# Altium PCB Terminal_IoT_rev2.PcbDoc
Units mm, origin at the board's own origin, x right, y up, seen from the top; angles counter-clockwise.
Board outline 100 x 80 mm, 2 copper layers (Top Layer, Bottom Layer); 47 components, 30 nets, 157 pads, 213 vias.
Unrouted connection lines stored in the file: 28.
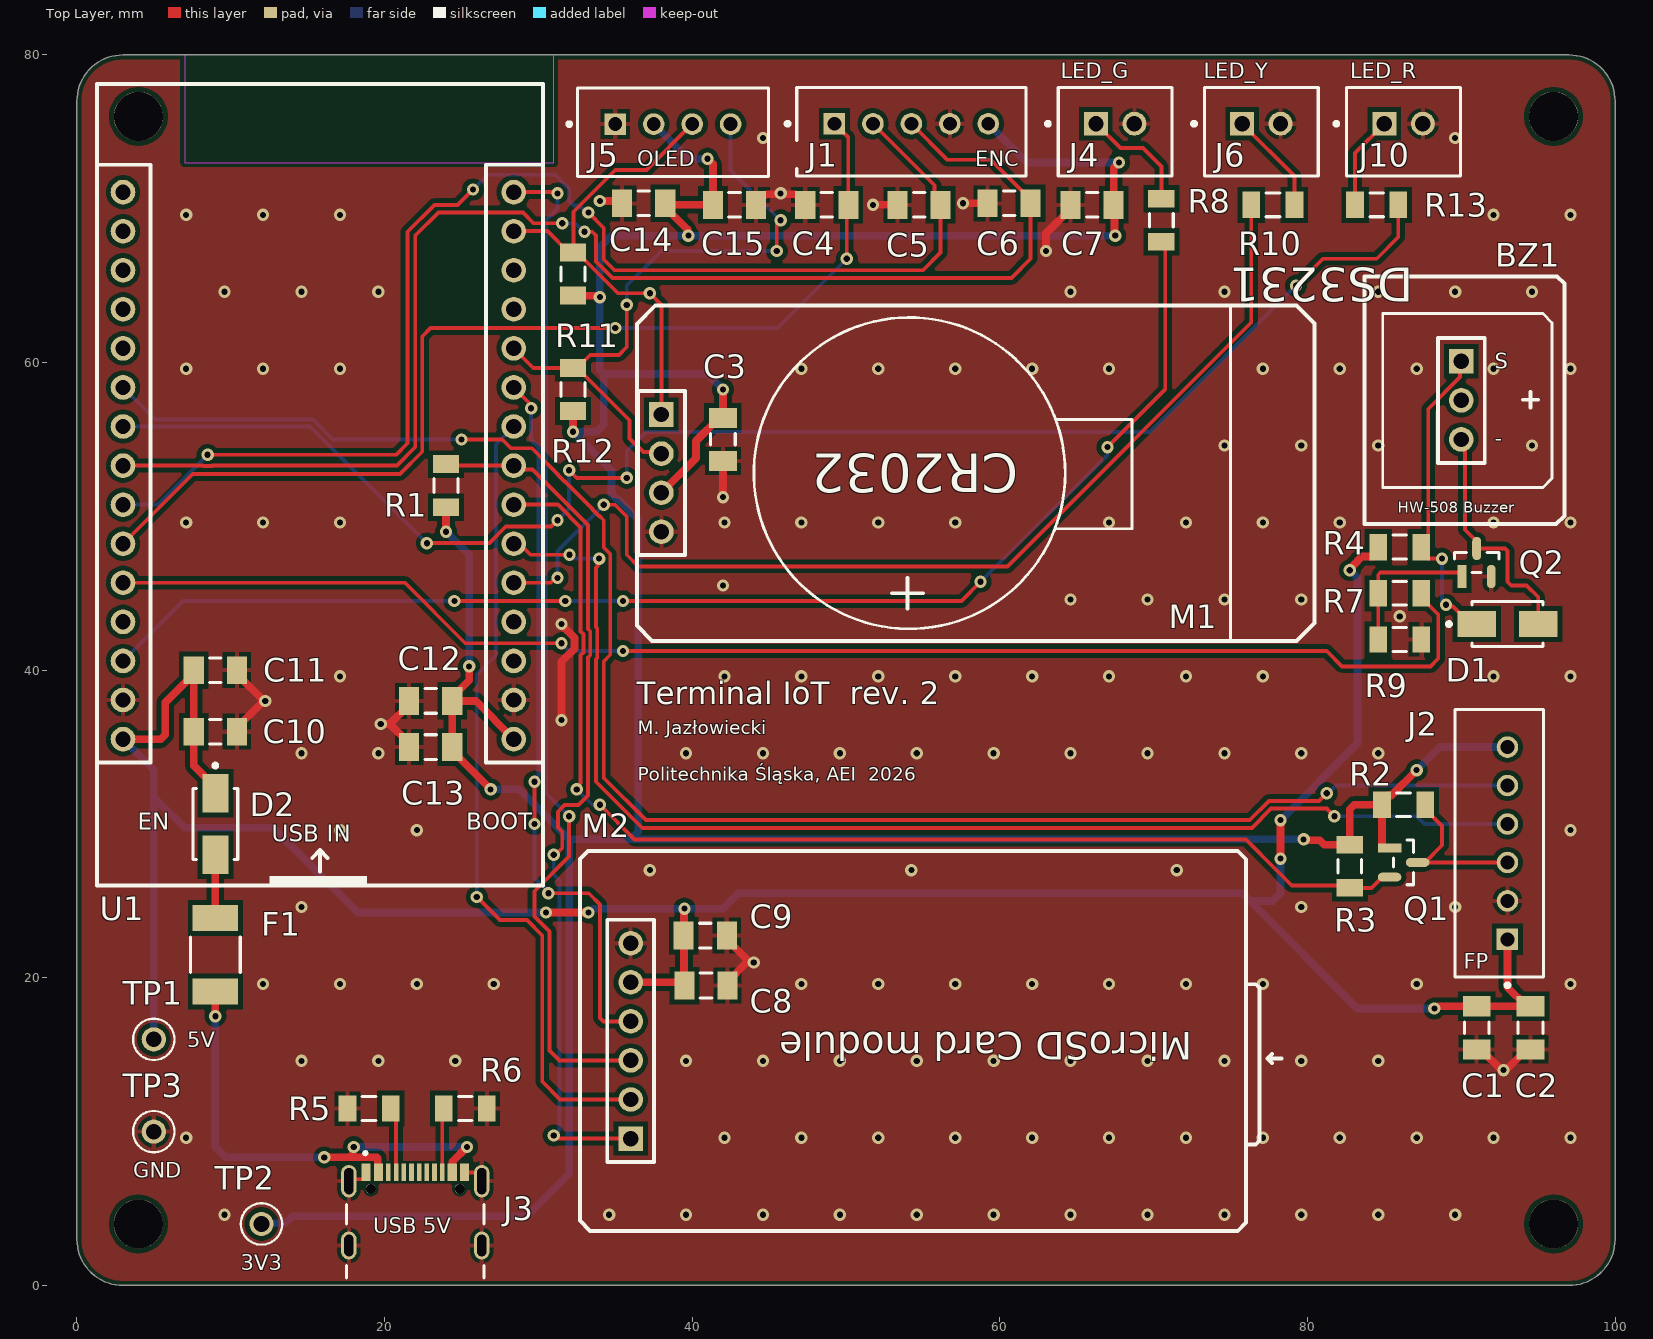
[diagram p0: Top Layer view]
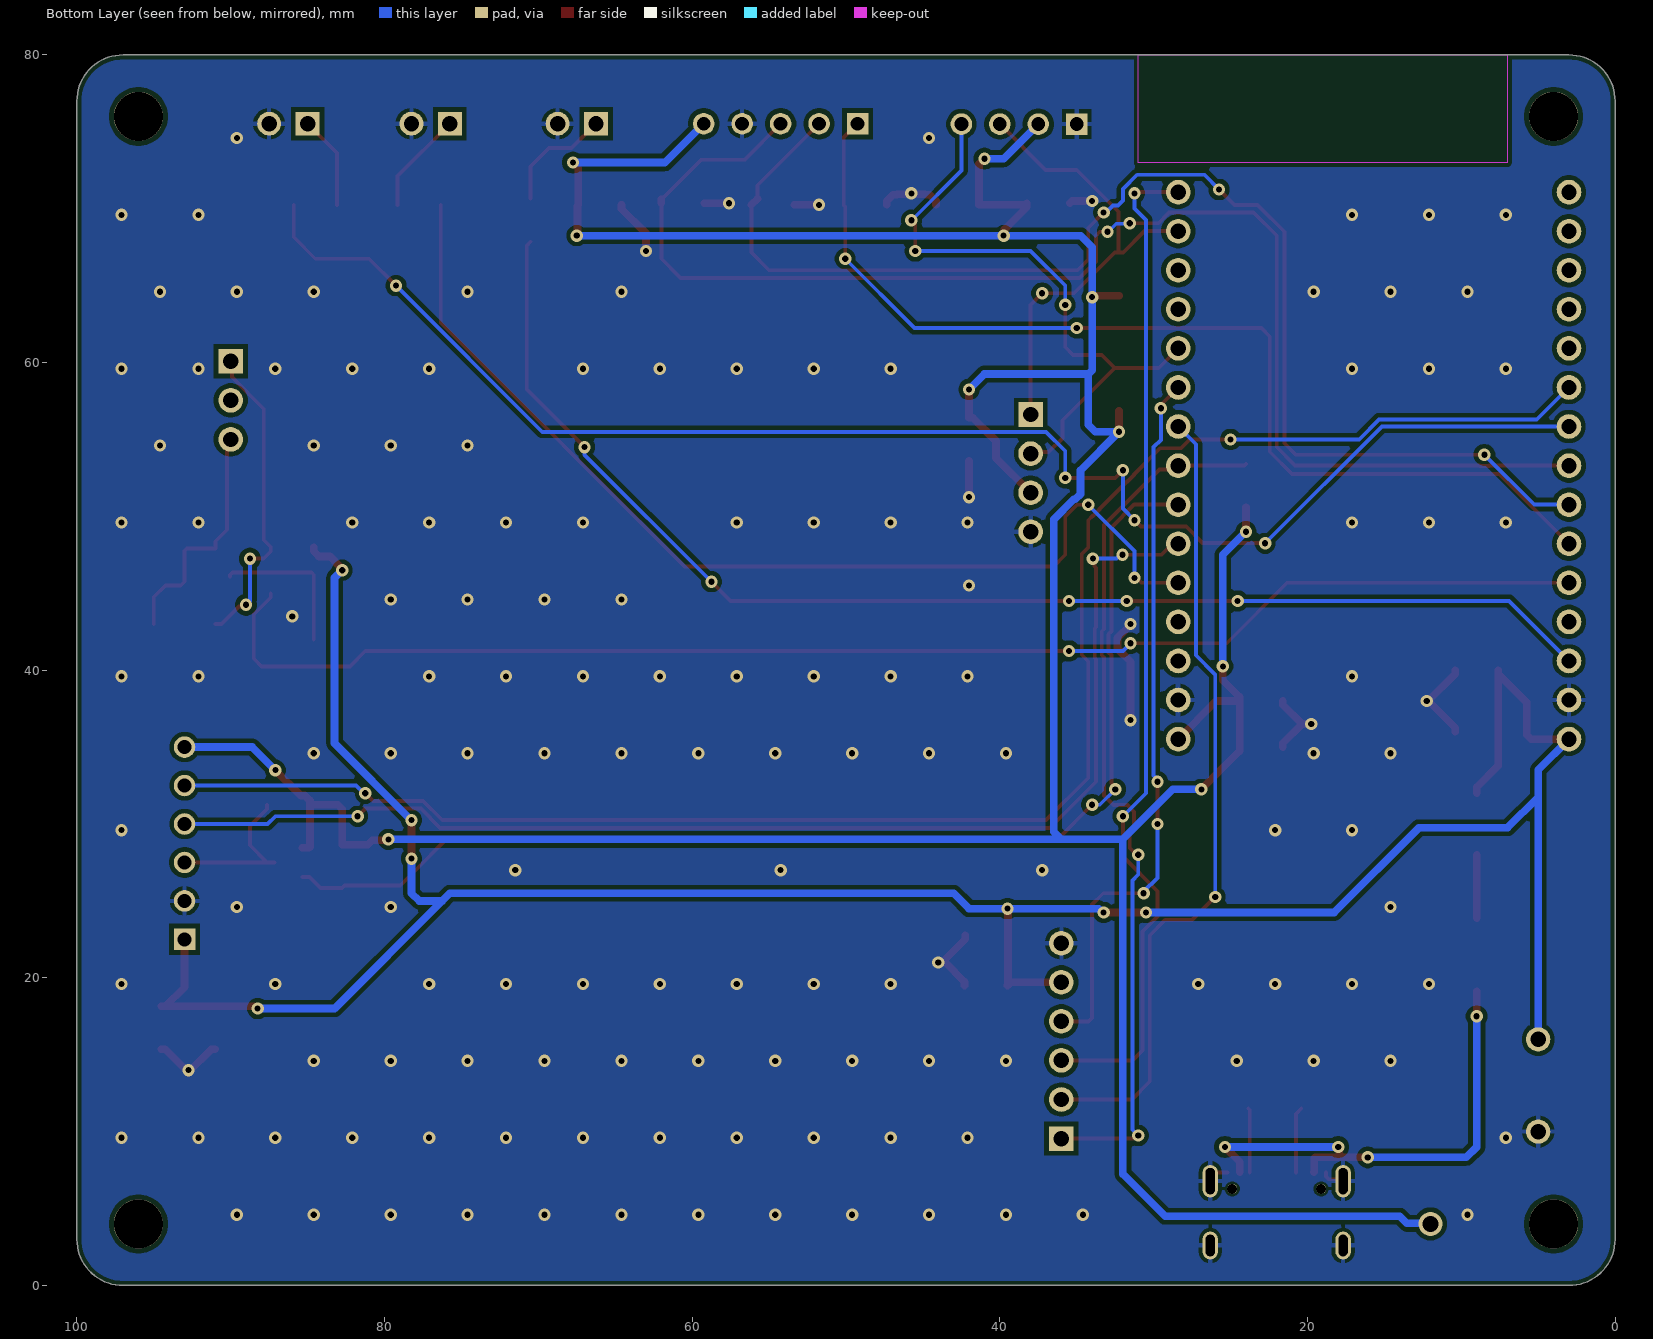
[diagram p1: Bottom Layer view, seen from below]
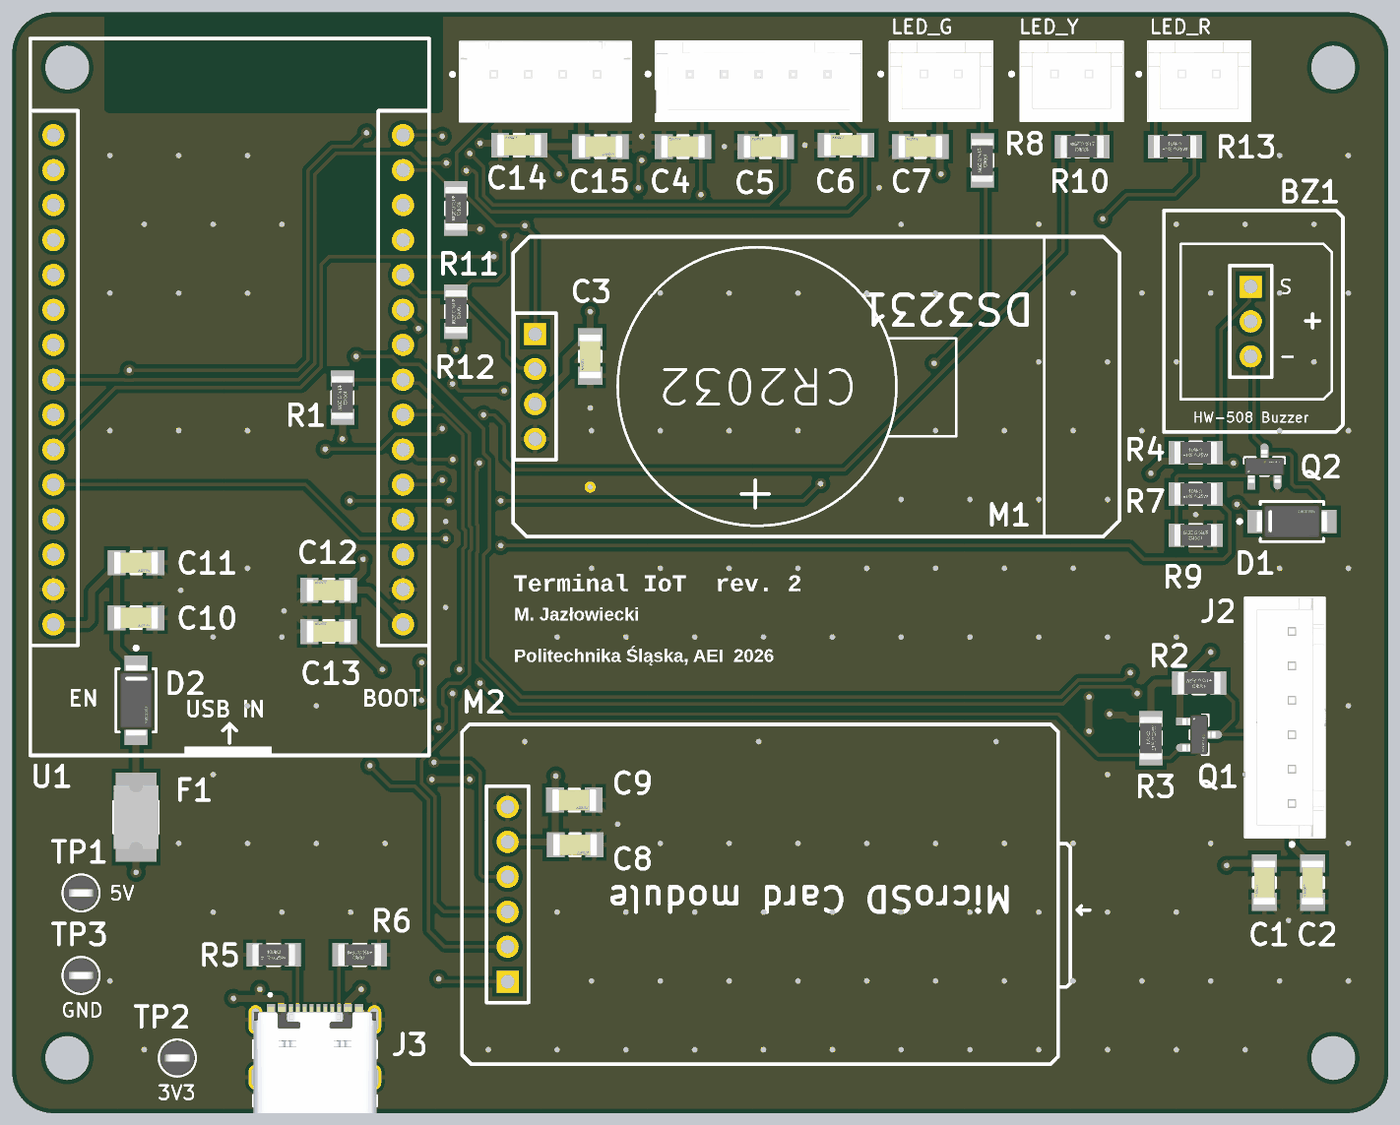
[diagram p2: 3D render of the assembled board from above, using the file's embedded part models]

## Layer stack, top to bottom
Top Solder: solder mask 0.0102, Solder Resist, Dk 3.5
Top Layer: signal copper 0.0356
Dielectric 1: dielectric 0.32, FR-4, Dk 4.8
Bottom Layer: signal copper 0.0356
Bottom Solder: solder mask 0.0102, Solder Resist, Dk 3.5

## Board outline
0,3 0,77 cw(c3,77) 3,80 97,80 cw(c97,77) 100,77 100,3 cw(c97,3) 97,0 3,0 cw(c3,3)

## Design rules (kind name [scope] priority, off if disabled: settings)
BoardOutlineClearance [All] p1: gap=0.3 ignorepadtopadclearanceinfootprint=FALSE
Clearance Clearance_J3 [InComponent('J3')] p1: gap=0.15 ignorepadtopadclearanceinfootprint=FALSE
Clearance Clearance_1 [InPolygon] p2: gap=0.3 ignorepadtopadclearanceinfootprint=FALSE
Clearance [All] p3: gap=0.2 ignorepadtopadclearanceinfootprint=FALSE
HoleSize [All] p1: absolutevalues=TRUE maxlimit=6.3 minlimit=0.3 maxpercent=80.000 minpercent=20.000
HoleToHoleClearance [All] p1: gap=0.5 allowstackedmicrovias=TRUE
MinimumAnnularRing [All] p1: minimumring=0.15
MinimumSolderMaskSliver MinimumSolderMaskSliver_USB_C [InComponent('J3')] p1: minsoldermaskwidth=0.09
MinimumSolderMaskSliver [All] p2: minsoldermaskwidth=0.254
PolygonConnect Via_Direct [IsVia] p1: connectstyle=Direct reliefconductorwidth=0.254 reliefentries=4 polygonreliefangle="90 Angle" airgapwidth=0.254
PolygonConnect [All] p2: connectstyle=Relief reliefconductorwidth=0.3 reliefentries=4 polygonreliefangle="90 Angle" airgapwidth=0.25
RoutingVias [All] p1: holewidth=0.6 width=0.8 viastyle="Through Hole" minholewidth=0.3 minwidth=0.6 maxholewidth=0.4 maxwidth=1
SolderMaskExpansion [All] p1: expansion=0 istentingtop=FALSE
SupplyNets "Schematic Supply Nets" [InNet('GND')] p1: voltage=0.000
Width Width_Power [InNetClass('Power')] p1: maxlimit=1.5 minlimit=0.3 preferedwidth=0.5
Width [All] p2: maxlimit=1 minlimit=0.2 preferedwidth=0.25
27 further rules are at their usual default settings.

## Classes and differential pairs
net class Power: V3V3 V5V0 VBUS

## Components (designator, comment, footprint, x,y, rotation, side; value= is the part's Value field where it differs from the comment)
BZ1 "Buzzer" BUZZER_HW508 90,60.08 r0 top
C1 "100nF" Capacitor_FP-C1206C-EB-IPC_B 91,16.75 r90 top
C2 "10μF" Capacitor_FP-C1206C-EB-IPC_B 94.5,16.75 r90 top
C3 "100nF" Capacitor_FP-C1206C-EB-IPC_B 42,55 r90 top
C4 "10nF" Capacitor_FP-C1206C-EB-IPC_B 48.75,70.25 r0 top
C5 "10nF" Capacitor_FP-C1206C-EB-IPC_B 54.75,70.25 r0 top
C6 "10nF" Capacitor_FP-C1206C-EB-IPC_B 60.6,70.35 r0 top
C7 "100nF" Capacitor_FP-C1206C-EB-IPC_B 66,70.25 r0 top
C8 "10μF" Capacitor_FP-C1206C-EB-IPC_B 40.9,19.5 r180 top
C9 "100nF" Capacitor_FP-C1206C-EB-IPC_B 40.849,22.75 r180 top
C10 "100nF" Capacitor_FP-C1206C-EB-IPC_B 9,36 r180 top
C11 "10μF" Capacitor_FP-C1206C-EB-IPC_B 9,40 r180 top
C12 "100nF" Capacitor_FP-C1206C-EB-IPC_B 23,38 r0 top
C13 "10μF" Capacitor_FP-C1206C-EB-IPC_B 23,35 r0 top
C14 "100nF" Capacitor_FP-C1206C-EB-IPC_B 36.85,70.35 r0 top
C15 "10μF" Capacitor_FP-C1206C-EB-IPC_B 42.75,70.25 r180 top
D1 "B340A" FP-SMA-MFG 93,43 r0 top
D2 "B340A" FP-SMA-MFG 9,30 r270 top
F1 "PTC 1,1A 1812" BOUR-MF-MSMF110-24X-2_V 9,21.5 r90 top
J1 "Waveshare 9533" FP-B5B-XH-A_LF_SN-MFG 54.25,75 r180 top
J2 "R307 Fingerprint sensor" FP-B6B-XH-A_LF_SN-MFG 92.475,28.75 r90 top
J3 "USB4105-GF-A" GCT_USB4105-GF-A 22,2.6 r0 top
J4 "GREEN" FP-B2B-XH-A_LF_SN-MFG 67.5,75 r0 top
J5 "OLED" FP-B4B-XH-A_LF_SN-MFG 38.75,74.975 r180 top
J6 "YELLOW" FP-B2B-XH-A_LF_SN-MFG 77,75 r0 top
J10 "RED" FP-B2B-XH-A_LF_SN-MFG 86.25,75 r0 top
M1 "DS3231 module" DS3231_MODUL 38,49 r180 top
M2 "MicroSD reader module" MICROSD_MODUL 36,9.55 r180 top
Q1 "BSS138" BSS138 86.25,27.5 r0 top
Q2 "BSS138" BSS138 91,47 r90 top
R1 "10K" "RESISTOR 1206" 24,52 r270 top
R2 "10K" "RESISTOR 1206" 86.25,31.25 r180 top
R3 "10K" "RESISTOR 1206" 82.75,27.25 r90 top
R4 "68" "RESISTOR 1206" 86,48 r0 top
R5 "5K1" "RESISTOR 1206" 19,11.5 r0 top
R6 "5K1" "RESISTOR 1206" 25.25,11.5 r180 top
R7 "100" "RESISTOR 1206" 86,45 r0 top
R8 "330" "RESISTOR 1206" 70.5,69.25 r270 top
R9 "4K7" "RESISTOR 1206" 86,42 r180 top
R10 "330" "RESISTOR 1206" 77.75,70.25 r180 top
R11 "4K7" "RESISTOR 1206" 32.25,65.75 r270 top
R12 "4K7" "RESISTOR 1206" 32.25,58.25 r270 top
R13 "330" "RESISTOR 1206" 84.5,70.25 r0 top
TP1 "5001" FP-5001-MFG 5,16 r0 top
TP2 "5001" FP-5001-MFG 12,4 r0 top
TP3 "5001" FP-5001-MFG 5,10 r0 top
U1 "ESP32-DevKitC" ESP32_DEVKITC_WROOM-32_15X2PIN 15.7,53.3 r0 top

## Footprints (in the part's own frame and the unit in brackets; to place one, negate y for a bottom-side part, rotate by r counter-clockwise, add the part's x,y. Pads: shape width x height; smd on the part's side, far side on the other; paste and mask are expansions set on the pad)
BOUR-MF-MSMF110-24X-2_V [mm] "Chip Fuse, 2-Leads, Body 4.6x3.24mm"
  rect 1.68x2.95 smd: 1(-2.39,0) 2(2.39,0)
  silkscreen extent -1.15,-1.62 1.15,1.62, body extent -2.3,-1.62 2.3,1.62, height 1.15
BSS138 [mm]
  rect 1.524x0.578 smd paste+0 mask+0: 1(-0.91,0.95)
  rrect100% 1.524x0.578 smd paste+0 mask+0: 2(-0.91,-0.95) 3(0.91,0)
  silkscreen extent -0.65,-1.45 0.65,1.45, body extent -1.92,-1.7 1.92,1.7, height 0.25
BUZZER_HW508 [mm]
  rect 1.6x1.6 hole 1: 1(0,0)
  round 1.6 hole 1: 2(0,-2.54) 3(0,-5.08)
  silkscreen extent -6.3,-10.58 6.7,5.52, body extent -6.3,-10.7 6.8,5.6, height 19
Capacitor_FP-C1206C-EB-IPC_B [mm]
  rect 1.305x1.806 smd paste+0 mask+0: 1(-1.401,0) 2(1.401,0)
  silkscreen extent -0.37,-0.8 0.37,0.8, body extent -2.3,-1.15 2.3,1.15, height 0.25
DS3231_MODUL [mm]
  rect 1.6x1.6 hole 1: 1(0,-7.62)
  round 1.6 hole 1: 2(0,-5.08) 3(0,-2.54) 4(0,0)
  silkscreen extent -42.47,-14.7 1.6,7.1, body extent -42.7,-14.9 1.78,7.15, height 19.5
ESP32_DEVKITC_WROOM-32_15X2PIN [mm]
  round 1.6 hole 1: 1(-12.7,17.78) 2(-12.7,15.24) 3(-12.7,12.7) 4(-12.7,10.16) 5(-12.7,7.62) 6(-12.7,5.08) 7(-12.7,2.54) 8(-12.7,0) 9(-12.7,-2.54) 10(-12.7,-5.08) 11(-12.7,-7.62) 12(-12.7,-10.16) 13(-12.7,-12.7) 14(-12.7,-15.24) 15(-12.7,-17.78) 16(12.7,-17.78) 17(12.7,-15.24) 18(12.7,-12.7) 19(12.7,-10.16) 20(12.7,-7.62) 21(12.7,-5.08) 22(12.7,-2.54) 23(12.7,0) 24(12.7,2.54) 25(12.7,5.08) 26(12.7,7.62) 27(12.7,10.16) 28(12.7,12.7) 29(12.7,15.24) 30(12.7,17.78)
  silkscreen extent -14.4,-27.31 14.6,24.8, body extent -14.4,-27.31 14.6,24.8, height 15
FP-5001-MFG [mm]
  round 1.57 hole 1.016 paste-2539.97 mask+0: 1(0,0)
  silkscreen extent -1.35,-1.34 1.35,1.34, body extent -1.45,-1.45 1.45,1.45, height 0.25
FP-B2B-XH-A_LF_SN-MFG [mm]
  rect 1.55x1.55 hole 1 paste-2539.97 mask+0: 1(-1.25,0.525)
  round 1.55 hole 1 paste-2539.97 mask+0: 2(1.25,0.525)
  silkscreen extent -4.5,-2.88 3.7,2.88, body extent -3.8,-2.98 3.8,2.98, height 0.25
FP-B4B-XH-A_LF_SN-MFG [mm]
  rect 1.4x1.4 hole 0.9 paste-2539.97 mask+0: 1(3.75,-0.525)
  round 1.4 hole 0.9 paste-2539.97 mask+0: 2(1.25,-0.525) 3(-1.25,-0.525) 4(-3.75,-0.525)
  silkscreen extent -6.2,-2.88 6.87,2.88, body extent -6.3,-2.98 6.3,2.98, height 0.25
FP-B5B-XH-A_LF_SN-MFG [mm]
  rect 1.4x1.4 hole 0.9 paste-2539.97 mask+0: 1(5,-0.525)
  round 1.4 hole 0.9 paste-2539.97 mask+0: 2(2.5,-0.525) 3(0,-0.525) 4(-2.5,-0.525) 5(-5,-0.525)
  silkscreen extent -7.45,-2.88 8.17,2.88, body extent -7.55,-2.98 7.55,2.98, height 0.25
FP-B6B-XH-A_LF_SN-MFG [mm]
  rect 1.4x1.4 hole 0.9 paste-2539.97 mask+0: 1(-6.25,-0.525)
  round 1.4 hole 0.9 paste-2539.97 mask+0: 2(-3.75,-0.525) 3(-1.25,-0.525) 4(1.25,-0.525) 5(3.75,-0.525) 6(6.25,-0.525)
  silkscreen extent -9.35,-2.88 8.7,2.88, body extent -8.8,-2.98 8.8,2.98, height 0.25
FP-SMA-MFG [mm]
  rect 2.5x1.7 smd paste+0 mask+0: 1(-2,0) 2(2,0)
  silkscreen extent -3.92,-1.46 2.3,1.46, body extent -3.35,-1.56 3.35,1.56, height 0.25
GCT_USB4105-GF-A [mm]
  rect 0.6x1.15 smd mask+0.05: A1_B12(-3.2,4.755) A4_B9(-2.4,4.755) B1_A12(3.2,4.755) B4_A9(2.4,4.755)
  rect 0.3x1.15 smd mask+0.05: A5(-1.25,4.755) A6(-0.25,4.755) A7(0.25,4.755) A8(1.25,4.755) B5(1.75,4.755) B6(0.75,4.755) B7(-0.75,4.755) B8(-1.75,4.755)
  oval 1x2.1 hole 0.6 slot 1.7 at 90 deg: SH1(-4.32,4.18) SH2(4.32,4.18)
  oval 1x1.8 hole 0.6 slot 1.4 at 90 deg: SH3(-4.32,0) SH4(4.32,0)
  round 0.65 hole 0.65 unplated: ""(-2.89,3.68) ""(2.89,3.68)
  silkscreen extent -4.47,-2.1 4.47,6.1, body extent -4.47,-2.6 4.47,5.11, height 3.32
MICROSD_MODUL [mm]
  rect 1.6x1.6 hole 1: 1(0,0)
  round 1.6 hole 1: 2(0,-2.54) 3(0,-5.08) 4(0,-7.62) 5(0,-10.16) 6(0,-12.7)
  silkscreen extent -42.3,-18.7 3.3,6, body extent -40.1,-18.8 3.4,6.1, height 14
"RESISTOR 1206" [mm]
  rect 1.156x1.71 smd paste+0 mask+0: 1(-1.401,0) 2(1.401,0)
  silkscreen extent -0.45,-0.77 0.45,0.77, body extent -2.23,-1.1 2.23,1.1, height 0.25

## Part data
BZ1: "positive, negative terminals + input signal"
C1 C2 C3 C4 C5 C6 C7 C8 C9 C10 C11 C12 C13 C14 C15: library part Cap, "Capacitor", LatestRevisionDate=17-Jul-2002, LatestRevisionNote="Re-released for DXP Platform.", PackageDescription="Radial Cap, Thru-Hole; 2 Leads; 0.3 in Pin Spacing", PackageReference=RAD-0.3, Published=8-Jun-2000, Publisher="Altium Limited"
D1 D2: library part CMP-1667-00003-3, "DIODE SCHOTTKY 40V 3A SMA", Average Rectified Current=3A, Capacitance=250pF, Case/Package=SMA, Forward Voltage=500mV, Max Forward Surge Current (Ifsm)=80A, Max Operating Temperature=125°C, Max Repetitive Reverse Voltage (Vrrm)=40V, Max Reverse Current=500uA, Min Operating Temperature=-55°C, Package Quantity=5000, Contact Plating=Tin, Current=3A, Current Rating=3A, Element Configuration=Single, Forward Current=3A, Height=2.3mm, Lead Free="Lead Free", Length=4.6mm, Max Reverse Voltage (DC)=40V, Mount="Surface Mount", Number of Pins=2, Output Current=3A, Packaging="Tape and Reel", Peak Non-Repetitive Surge Current=80A, Polarity=Standard, Radiation Hardening=No, REACH SVHC="No SVHC", RoHS Compliant=Yes, Series=-, Termination=SMD/SMT, Voltage=40V, Voltage Rating (DC)=40V, Weight=0.002258oz, Width=2.92mm
F1: library part CMP-2100-03655-1, "PTC Resettable Fuse, 24 V, 1.1 A, -40 to 85 degC, 2-Pin SMD, RoHS, Tape and Reel", Case Code (Imperial)=1812, Case Code (Metric)=4532, Manufacturer=Bourns, Max Current Rating=20A, Max Operating Temperature=85degC, Min Operating Temperature=-40degC, Package Description="2-Pin Surface Mount Device, Body 4.6 x 3.24 mm", Package Reference=MF-MSMF110-24X-2, Power Dissipation=800mW, Supply Voltage=24V, Case/Package=1812, Contact Plating=Gold, Datasheet URL=http://www.bourns.com/docs/Product-Datasheets/mfmsmf.pdf, Datasheet Version="Rev. AG, 08/2016", Height=1.6mm, Length=4.83mm, Manufacturer URL=http://www.bourns.com/, Mount=SurfaceMount, Number of Terminals=2, Packaging=TapeandReel, Radiation Hardening=No, REACH SVHC=NoSVHC, RoHSCompliant=true, Voltage Rating=24V, Voltage Rating (DC)=24V, Width=3.41mm
J1: "compact rotary encoder module featuring a built-in button, designed to detect clockwise and anti-clockwise rotation for menu navigation, volume control, or motor positioning"
J2: library part "GROW R307S", "optical fingerprint sensor module from Hangzhou Grow Technology Co., Ltd. It features a high-speed DSP processor, flash memory for storage"
J3: Package=None, Availability=Unavailable, MF="{'manufacturer': u'GCT'}", MP=USB4105-GF-A, Price=None
J4 J6 J10: library part LED2, "Typical RED, GREEN, YELLOW, AMBER GaAs LED", LatestRevisionDate=17-Jul-2002, LatestRevisionNote="Re-released for DXP Platform.", PackageDescription="SM LED; 2 Flat Leads", PackageReference=3.2X1.6X1.1, PackageVersion=Feb-2002, Published=8-Jun-2000, Publisher="Altium Limited"
J5: library part CMP-17439-000250-1, "CONN HEADER VERT 4POS 2.5MM", Color=Natural, Contact Resistance=20mR, Current Rating=3A, Flammability Rating="UL94 V-0", Housing Color=White, Insulation Resistance=1GR, Max Operating Temperature=85°C, Max Voltage Rating (AC)=250V, Min Operating Temperature=-25°C, Package Quantity=500, Connector Type=Header, Contact Finish - Mating=TIN, Contact Material=Brass, Contact Plating=Tin, Contact Shape=Square, Contact Type="Male Pin", Depth=5.75mm, Fastening Type=Detent, Gender=Male, Housing Material=Polyamide, Insulation Color=Natural, Insulation Material=Nylon, Lead Free="Lead Free", Lead Pitch=2.5mm, Length=12.4mm, Mated Stacking Heights=9.8mm, Material=Polyamide, Max Current Rating=3A, Max Voltage Rating (DC)=250V, Mount="Through Hole", Number of Contacts=4, Number of Positions=4, Number of Rows=1, Orientation=Straight, Packaging=Bulk, Pitch=2.5mm, REACH SVHC="No SVHC", Series=XH, Termination=Solder, Voltage Rating=250V, Voltage Rating (AC)=250V, Wire/Cable Gauge=22AWG
M2: library part "microSD Card module", "SPI INTERFACE, 2.54mm, 3.3V - 5.0V"
Q1 Q2: library part MOSFET-N, "N-Channel MOSFET", LatestRevisionDate=17-Jul-2002, LatestRevisionNote="Re-released for DXP Platform.", PackageDescription="TO, Flat Index; 3 In-Line, Axial Leads; Body Dia. 4.6mm; Lead Dia. 0.5 mm (max)", PackageReference=E3, PackageVersion=1995/1996, Published=8-Jun-2000, Publisher="Altium Limited"
R1 R2 R3 R4 R5 R6 R7 R8 R9 R10 R11 R12 R13: library part Res2, "Resistor", LatestRevisionDate=17-Jul-2002, LatestRevisionNote="Re-released for DXP Platform.", PackageDescription="Axial Device, Thru-Hole; 2 Leads; 0.4 in Pin Spacing", PackageReference=AXIAL-0.4, Published=8-Jun-2000, Publisher="Altium Limited"
TP1 TP2 TP3: library part CMP-2000-05181-2, "PC TEST POINT MINIATURE BLACK", Color=Black, Flammability Rating="UL94 V-0", Package Quantity=100, Body Material=Bronze, Contact Material=Bronze, Contact Plating=Silver, Diameter=2.54mm, Height=0.3inch, Hole Diameter=1.6mm, Housing Color=Black, Inside Diameter=1.27mm, Insulation=Insulated, Insulation Material=Nylon, Lead Free="Lead Free", Length=7.62mm, Material=Nylon, Mount="Through Hole", Number of Contacts=1, Number of Ports=1, Orientation=Straight, Outside Diameter=2.54mm, Packaging=Bulk, Plating=Silver, REACH SVHC="No SVHC", RoHS Compliant=Yes, Series=THM, Termination="Through Hole"
U1: "Płytka rozwojowa z układem ESP32, 30 wyprowadzeń, mostek CP2102, stabilizator AMS1117-3.3"

## Free pads (board coordinates)
  round 3.2 hole 3.2 unplated: H1(4,4) H2(96,4) H3(4,76) H4(96,76)

## Via types
v1: diameter 0.8, hole 0.4, Top Layer to Bottom Layer, tented both sides, 212 vias
v2: diameter 0.8, hole 0.4, Top Layer to Bottom Layer, 1 vias

## Nets (pads, with @x,y where several pads share a name; then routed paths per layer and width w, separated by ;. In a path a pad name is that pad's centre, name@x,y a point inside that pad or via, vN(x,y) a via of type N, cw(c..) or ccw(c..) an arc to the next point about the centre after c; other vN are vias at no path point)
BUZZER_SIG: R7.2 U1.11 | length 92.7
  Top Layer w0.25: U1.11 21.32,45.68 25.25,41.75 v1(31.5,41.75) ; v1(35.5,41.25) 81.25,41.25 82.25,40.25 88,40.25 88.5,40.75 88.5,43.624 87.401,44.723 R7.2
  Bottom Layer w0.25: v1(31.5,41.75) 32,41.25 v1(35.5,41.25)
ENC_SIA: C4.2 J1.1 U1.10 | length 68.3
  Top Layer w0.25: U1.10 7.53,52.75 21,52.75 22.45,54.2 22.45,61.7 23,62.25 v1(35,62.25) ; J1.1 50.151,74.624 C4.2 50.052,70.151 v1(50.052,66.75)
  Bottom Layer w0.25: v1(35,62.25) 45.552,62.25 v1(50.052,66.75)
ENC_SIB: C5.2 J1.2 U1.9 | length 85
  Top Layer w0.25: v1(8.5,54) 20.75,54 21.5,54.75 21.5,68.5 23.25,70.25 24.75,70.25 v1(25.75,71.25) ; v1(33.25,69.75) 34.25,68.75 34.25,66.701 34.951,66 55,66 56.151,67.151 C5.2 ; J1.2 55.748,71.527 C5.2@55.748,70.652
  Top Layer w0.5: C5.2@55.748,70.652 C5.2
  Bottom Layer w0.25: U1.9 5.26,50.76 v1(8.5,54) ; v1(25.75,71.25) 26.705,72.205 31.07,72.205 32,71.275 32,70.533 32.325,70.209 32.642,70.209 33.101,69.75 v1(33.25,69.75)
ENC_SW: C6.2 J1.3 U1.8 | length 90.8
  Top Layer w0.25: U1.8 8.175,53.3 8.2,53.275 8.8,53.275 8.825,53.3 20.8,53.3 22,54.5 22,68.25 23.5,69.75 29.003,69.75 29.695,69.058 v1(31.55,69.058) ; v1(33,68.5) 33.5,68.5 33.75,68.25 33.75,66.564 34.814,65.5 60.75,65.5 62.001,66.751 C6.2 ; J1.3 56.597,73.178 59.424,73.178 C6.2@62.001,70.601
  Top Layer w0.5: C6.2 C6.2@62.001,70.601
  Bottom Layer w0.25: v1(31.55,69.058) 31.582,69.026 32.43,69.026 32.956,68.5 v1(33,68.5)
FP_RX: Q1.2 R3.1 U1.22 | length 78
  Top Layer w0.25: U1.22 31.265,50.76 32.75,49.275 32.75,42.515 32.925,42.34 32.925,41.16 32.75,40.985 32.75,32.649 32.5,32.399 v1(32.5,32.25) ; v1(34,31.25) 36.25,29 76,29 76.975,28.025 76.975,28 78.975,26 82.599,26 R3.1 84.166,25.849 84.867,26.55 Q1.2
  Bottom Layer w0.25: v1(32.5,32.25) 33.5,31.25 v1(34,31.25)
FP_TOUCH: J2.5 U1.6 | length 112.8
  Top Layer w0.25: v1(25,55) 27.649,55 28.224,54.425 29.575,54.425 31.275,52.725 31.275,52.7 31.7,52.275 31.725,52.275 33.525,50.475 33.525,50.45 33.95,50.025 33.975,50.025 34.25,49.75 34.25,47.975 34.675,47.55 34.675,41.001 34.25,40.576 34.25,33 37,30.25 76.25,30.25 77.5,31.5 80.75,31.5 v1(81.25,32)
  Bottom Layer w0.25: U1.6 3.12,58.38 3.12,58.26 5.09,56.29 15.346,56.29 16.636,55 v1(25,55) ; v1(81.25,32) 81.346,32 81.846,32.5 J2.5
FP_TX: J2.4 U1.21 | length 82
  Top Layer w0.25: U1.21 28.765,48.22 29.485,47.5 v1(32.025,47.5) ; v1(33.95,47.25) 33.845,47.145 33.845,46.756 33.75,46.661 33.75,42.788 33.825,42.713 33.825,40.787 33.75,40.712 33.75,32.75 36.75,29.75 76.386,29.75 77.636,31 81.275,31 81.275,30.975 v1(81.75,30.5)
  Bottom Layer w0.25: v1(32.025,47.5) 32.174,47.5 32.424,47.25 v1(33.95,47.25) ; v1(81.75,30.5) 87.096,30.5 87.596,30 J2.4
GND: C1.1 C2.1 C3.1 C4.1 C5.1 C6.1 C7.1 C8.1 C9.1 C10.1 C11.1 C12.1 C13.1 C14.1 C15.1 J1.4 J2.2 J3.A1_B12 J3.B1_A12 J3.SH1 J3.SH2 J3.SH3 J3.SH4 J4.2 J5.1 J6.2 J10.2 M1.4 M2.6 Q2.2 R5.1 R6.1 R9.1 TP3.1 U1.14 U1.17 | length 44.6
  Top Layer w0.25: J3.SH1 17.805,6.905 18.625,6.905 18.8,7.08 J3.A1_B12 ; J3.B1_A12 25.974,7.355 26.32,7.009 J3.SH2
  Top Layer w0.5: C10.1 10.401,36.251 12.093,37.943 12.193,37.943 v1(12.25,38) 12.15,38 10.401,39.749 C11.1 ; v1(19.75,36.5) 20.35,36.5 ; C13.1 21.599,35.251 20.35,36.5 ; C12.1 21.599,37.749 20.35,36.5 ; v1(31.5,36.75) 31.5,40.548 32.35,41.398 32.35,42.102 31.5,42.952 v1(31.5,43) ; v1(34,70.5) 35.299,70.5 C14.1 ; v1(42,51.25) C3.1 ; C9.1 42.25,22.499 43.55,21.199 43.55,21 ; C8.1 42.301,19.751 43.55,21 ; v1(44,21) 43.55,21 ; C15.1 44.151,70.501 44.553,70.903 44.804,70.903 44.843,70.943 45.693,70.943 v1(45.75,71) 45.807,70.943 46.657,70.943 46.696,70.903 46.947,70.903 47.349,70.501 C4.1 ; v1(51.75,70.25) C5.1 ; v1(57.6,70.35) C6.1 ; v1(63,67.25) 63,68.4 64.599,69.999 C7.1 ; C1.1 91.251,15.349 92.75,13.85 94.249,15.349 C2.1
  other v1: 9.6,4.6 34.6,4.6 39.6,4.6 44.6,4.6 49.6,4.6 54.6,4.6 59.6,4.6 64.6,4.6 69.6,4.6 74.6,4.6 79.6,4.6 84.6,4.6 89.6,4.6 7.1,9.6 42.1,9.6 47.1,9.6 52.1,9.6 57.1,9.6 62.1,9.6 67.1,9.6 72.1,9.6 77.1,9.6 82.1,9.6 87.1,9.6 92.1,9.6 97.1,9.6 92.75,14 14.6,14.6 19.6,14.6 24.6,14.6 39.6,14.6 44.6,14.6 49.6,14.6 54.6,14.6 59.6,14.6 64.6,14.6 69.6,14.6 74.6,14.6 79.6,14.6 84.6,14.6 12.1,19.6 17.1,19.6 22.1,19.6 27.1,19.6 47.1,19.6 52.1,19.6 57.1,19.6 62.1,19.6 67.1,19.6 72.1,19.6 77.1,19.6 87.1,19.6 97.1,19.6 14.6,24.6 79.6,24.6 89.6,24.6 37.25,27 54.25,27 71.5,27 17.1,29.6 22.1,29.6 97.1,29.6 14.6,34.6 19.6,34.6 39.6,34.6 44.6,34.6 49.6,34.6 54.6,34.6 59.6,34.6 64.6,34.6 69.6,34.6 74.6,34.6 79.6,34.6 84.6,34.6 17.1,39.6 42.1,39.6 47.1,39.6 52.1,39.6 57.1,39.6 62.1,39.6 67.1,39.6 72.1,39.6 77.1,39.6 92.1,39.6 97.1,39.6 86,43.5 64.6,44.6 69.6,44.6 74.6,44.6 79.6,44.6 7.1,49.6 12.1,49.6 17.1,49.6 42.1,49.6 47.1,49.6 52.1,49.6 57.1,49.6 67.1,49.6 72.1,49.6 77.1,49.6 82.1,49.6 92.1,49.6 97.1,49.6 74.6,54.6 79.6,54.6 84.6,54.6 94.6,54.6 7.1,59.6 12.1,59.6 17.1,59.6 47.1,59.6 52.1,59.6 57.1,59.6 62.1,59.6 67.1,59.6 77.1,59.6 82.1,59.6 87.1,59.6 92.1,59.6 97.1,59.6 9.6,64.6 14.6,64.6 19.6,64.6 64.6,64.6 74.6,64.6 84.6,64.6 89.6,64.6 94.6,64.6 7.1,69.6 12.1,69.6 17.1,69.6 92.1,69.6 97.1,69.6 44.6,74.6 89.6,74.6
  other v2: 42,45.5
I2C_SCL: J5.3 M1.1 R11.1 U1.29 | length 31.6
  Top Layer w0.25: U1.29 30.584,68.54 31.973,67.151 R11.1 ; M1.1 M1.1@38.25,56.87 ; M1.1@38,56.87 38,63.75 v1(37.25,64.5) 35.178,64.5 32.527,67.151 R11.1 ; J5.3 37.028,72.528 35.002,72.528 32.275,69.8 32.275,68.8 32.275,67.176 R11.1
I2C_SDA: J5.4 M1.2 R12.1 U1.26 | length 41.3
  Top Layer w0.25: U1.26 29.669,59.651 R12.1 R12.1@32.527,59.651 ; v1(35.75,63.75) 35.75,61 35.25,60.5 33.376,60.5 R12.1@32.527,59.651 ; M1.2 37.905,54.175 36.825,54.175 35.928,55.072 35.928,56.25 R12.1@32.527,59.651 ; v1(45.5,67.25) 45.5,69 v1(45.75,69.25)
  Bottom Layer w0.25: v1(35.75,63.75) 35.75,65 38,67.25 v1(45.5,67.25) ; J5.4 42.5,72.475 45.725,69.25 v1(45.75,69.25)
LED_GREEN: R8.2 U1.13 | length 85.1
  Top Layer w0.25: v1(24.539,44.5) v1(31.75,44.5) ; v1(35.5,44.5) 57.5,44.5 v1(58.75,45.75) ; v1(67,54.5) 70.75,58.25 70.75,67.599 R8.2
  Bottom Layer w0.25: U1.13 6.9,44.5 v1(24.539,44.5) ; v1(31.75,44.5) v1(35.5,44.5) ; v1(58.75,45.75) 67,54 v1(67,54.5)
LED_RED: R13.2 U1.7 | length 99.3
  Top Layer w0.25: v1(22.75,48.25) 22.775,48.275 26.813,48.275 27.883,49.345 30.829,49.345 31.234,49.75 v1(31.25,49.75) ; v1(32,53) 32.5,52.5 v1(35.75,52.5) ; v1(79.25,65) 81,66.75 84.5,66.75 85.901,68.151 R13.2
  Bottom Layer w0.25: U1.7 15.16,55.84 v1(22.75,48.25) ; v1(31.25,49.75) 32,50.5 v1(32,53) ; v1(35.75,52.5) 35.75,54.25 36.995,55.495 69.745,55.495 v1(79.25,65)
LED_YELLOW: R10.2 U1.20 | length 68.4
  Top Layer w0.25: U1.20 30.781,45.68 31.101,46 v1(31.25,46) ; v1(34.25,50.75) 35,50.75 35.75,50 35.75,47.5 36.5,46.75 60.5,46.75 76.349,62.599 R10.2
  Bottom Layer w0.25: v1(31.25,46) 31.25,47.75 v1(34.25,50.75)
NetBZ1_1: BZ1.1 D1.1 R4.2 | length 20.6
  Top Layer w0.25: v1(88.75,47.25) 88.73,47.27 87.854,47.27 87.401,47.723 R4.2 87.854,48.453 87.854,56.985 89.92,59.051 89.92,60 BZ1.1 ; v1(89,44.25) 89.105,44.145 89.455,44.145 90.6,43 D1.1
  Bottom Layer w0.25: v1(88.75,47.25) 88.75,44.5 v1(89,44.25)
NetBZ1_3: BZ1.3 D1.2 Q2.3 | length 15.7
  Top Layer w0.25: BZ1.3 90.25,54.75 90.25,49.133 91,48.383 Q2.3 92.84,47.91 93,47.75 93,45.75 93.25,45.5 94.25,45.5 95,44.75 D1.2
NetD2_2: D2.2 F1.2 | length 4.1
  Top Layer w0.5: F1.2 D2.2
NetJ2_3: J2.3 Q1.3 R2.1 | length 11
  Top Layer w0.25: R2.1 87.651,30.973 88.75,29.874 88.75,28.617 87.633,27.5 Q1.3 J2.3
NetJ3_A5: J3.A5 R5.2 | length 4.3
  Top Layer w0.25: R5.2 20.75,11.151 J3.A5
NetJ3_B5: J3.B5 R6.2 | length 4.2
  Top Layer w0.25: J3.B5 23.75,11.401 R6.2
NetJ4_1: J4.1 R8.1 | length 7.5
  Top Layer w0.25: J4.1 67.838,73.937 69.313,73.937 70.5,72.75 R8.1
NetJ6_1: J6.1 R10.1 | length 6.7
  Top Layer w0.25: J6.1 79.151,72.124 R10.1
NetJ10_1: J10.1 R13.1 | length 6.1
  Top Layer w0.25: R13.1 83.099,73.624 J10.1
NetQ2_1: Q2.1 R7.1 R9.2 | length 9.9
  Top Layer w0.25: R9.2 R7.1 84.599,46.202 84.745,46.349 89.886,46.349 90.05,46.185 Q2.1
SD_CS: M2.1 R1.1 U1.23 | length 57.8
  Top Layer w0.25: R1.1 24.101,53.3 U1.23 28.658,53.042 29.62,53.042 33.225,49.437 33.225,42.677 33.375,42.527 33.375,40.973 33.225,40.823 33.225,31.846 32.604,31.225 31.7,31.225 31.275,30.8 31.275,29.761 31.55,29.486 31.55,28.446 31.104,28 v1(31,28) ; v1(31,9.75) 31.149,9.75 31.349,9.55 M2.1
  Bottom Layer w0.25: v1(31,9.75) 31.375,10.125 31.375,26.338 31,26.713 v1(31,28)
SPI_CLK: M2.2 U1.24 | length 52.6
  Top Layer w0.25: v1(26,25.25) 27.5,23.75 29.25,23.75 30.25,22.75 30.25,13.25 31.41,12.09 M2.2
  Bottom Layer w0.25: v1(26,25.25) 26,39.725 27.25,40.975 27.25,54.69 U1.24
SPI_MISO: M2.4 U1.25 | length 47.1
  Top Layer w0.25: U1.25 29.536,57.244 29.536,57.036 v1(29.53,57.03) ; v1(29.75,30) v1(29.75,32.75) ; v1(30.65,25.5) 33.275,25.5 34,24.775 34,17.396 34.226,17.17 M2.4
  Bottom Layer w0.25: v1(29.53,57.03) 29.53,54.97 30,54.5 30,33.149 29.75,32.899 v1(29.75,32.75) ; v1(29.75,30) 29.75,26.5 30.65,25.6 v1(30.65,25.5)
SPI_MOSI: M2.3 U1.30 | length 66.4
  Top Layer w0.25: U1.30 31.17,71.08 v1(31.25,71) ; v1(32,30.5) 32,27.875 29.75,25.625 29.75,23.975 30.725,23 30.725,15.275 31.37,14.63 M2.3
  Bottom Layer w0.25: v1(31.25,71) 31.25,70.017 30.5,69.267 30.5,32 v1(32,30.5)
V3V3: C3.2 C7.2 C12.2 C13.2 C14.2 C15.2 J1.5 J2.6 J5.2 M1.3 Q1.1 R1.2 R2.2 R3.2 R11.2 R12.2 TP2.1 U1.16 | length 267.5
  Top Layer w0.5: v1(24,49) R1.2 ; v1(25.5,40.25) 25.5,39.35 24.401,38.251 C12.2 ; v1(26.9,32.25) 24.401,34.749 C13.2 C12.2 ; U1.16 25.92,38 C12.2 ; v1(32.25,55.5) R12.2 ; R11.2 33.82,64.349 33.919,64.25 v1(34,64.25) ; M1.3 40.25,53.79 40.25,54.902 41.749,56.401 C3.2 v1(42,58.25) ; v1(39.75,68.25) 39.693,68.307 39.693,68.657 38.251,70.099 C14.2 38.351,70.25 C15.2 41.349,72.901 v1(41,73.25) ; v1(67.5,68.25) 67.45,68.3 67.45,70.2 C7.2 67.401,72.651 v1(67.75,73) ; v1(79.75,29) 79.807,28.943 80.807,28.943 81.099,28.651 R3.2 82.75,30.957 83.043,31.25 R2.2 ; Q1.1 84.888,28.45 84.849,28.489 R2.2 ; v1(87.099,33.5) 85.454,31.855 85.177,31.855 84.849,31.527 R2.2
  Bottom Layer w0.5: TP2.1 12.035,4.035 13.535,4.035 14,4.5 29.25,4.5 32,7.25 32,29 ; v1(24,49) 25.5,47.5 v1(25.5,40.25) ; v1(26.9,32.25) 28.75,32.25 32,29 ; J5.2 39.75,73.25 v1(41,73.25) ; v1(42,58.25) 42,58.27 41.02,59.25 34.25,59.25 ; J1.5 61.775,73 v1(67.75,73) ; v1(67.5,68.25) v1(39.75,68.25) 34.75,68.25 34,67.5 v1(34,64.25) 34,59.5 34.25,59.25 ; v1(79.75,29) 36,29 ; v1(87.099,33.5) 88.599,35 J2.6 ; 32,29 36,29 ; 34.25,59.25 34.25,55.956 33.794,55.5 v1(32.25,55.5) 34.75,53 34.75,51.452 35.1,51.102 35.196,51.102 36.5,49.798 36.5,29.5 36,29
V5V0: C1.2 C2.2 C8.2 C9.2 C10.2 C11.2 D2.1 J2.1 M2.5 R4.1 TP1.1 U1.15 | length 174.3
  Top Layer w0.5: U1.15 3.02,35.5 5.457,35.5 5.75,35.793 5.75,37.9 C11.2@7.599,39.749 ; C11.2 C11.2@7.599,39.749 ; D2.1 9,32.4 7.599,33.801 C10.2 C11.2@7.599,39.749 ; v1(30.5,24.25) v1(33.25,24.25) ; M2.5 39.289,19.71 C8.2 ; C8.2@39.474,19.71 39.474,22.725 C9.2 39.474,22.776 39.474,24.474 v1(39.5,24.5) ; v1(78.25,27.75) v1(78.25,30.25) ; v1(82.75,46.5) 82.75,46.581 83.25,47.081 83.25,47.102 83.543,47.395 84.271,47.395 84.599,47.723 R4.1 ; v1(88.25,18) 88.331,18 88.482,18.151 C1.2 C2.2@94.249,18.151 ; J2.1 93,19.4 C2.2@94.249,18.151 ; C2.2 C2.2@94.249,18.151
  Bottom Layer w0.5: U1.15 5,33.52 5,31.75 ; TP1.1 5,31.75 ; v1(30.5,24.25) 18.25,24.25 12.75,29.75 7,29.75 5,31.75 ; v1(33.25,24.25) 33.331,24.25 33.581,24.5 42,24.5 43,25.5 75.75,25.5 76.25,25 ; v1(78.25,27.75) 78.25,25.5 77.75,25 76.25,25 ; v1(78.25,30.25) 83.25,35.25 83.25,46 v1(82.75,46.5) ; v1(88.25,18) 83.25,18 76.25,25
VBUS: F1.1 J3.A4_B9 J3.B4_A9 | length 32.1
  Top Layer w0.5: v1(9,17.5) F1.1 ; v1(16.08,8.33) 17.75,8.33 ; v1(18,9) 17.943,8.943 17.943,8.523 17.75,8.33 ; J3.A4_B9 19.55,7.405 19.55,8.28 19.5,8.33 17.75,8.33 ; J3.B4_A9 24.4,8.037 v1(25.363,9)
  Bottom Layer w0.5: v1(9,17.5) 9,9 9.67,8.33 v1(16.08,8.33) ; v1(18,9) v1(25.363,9)
pads on no net: BZ1.2 J3. J3.A6 J3.A7 J3.A8 J3.B6 J3.B7 J3.B8 U1.1 U1.2 U1.3 U1.4 U1.5 U1.12 U1.18 U1.19 U1.27 U1.28

## Polygon pours and split planes (outlines as drawn)
GND on Bottom Layer "GND_L02_P001" (solid, remove dead copper, pour order 1): 0,3 0,77 cw(c3,77) 3,80 97,80 cw(c97,77) 100,77 100,3 cw(c97,3) 97,0 3,0 cw(c3,3)
GND on Top Layer "GND_L01_P000" (solid, remove dead copper, pour order 0): 0,3 0,77 cw(c3,77) 3,80 97,80 cw(c97,77) 100,77 100,3 cw(c97,3) 97,0 3,0 cw(c3,3)

## Keep-outs
Keep-Out Layer:
  region: 7,73 31,73 31,80 7,80

## Silkscreen, mask and mechanical layers (free items; w line width, h text height)
Top Overlay:
  text "LED_G" at 63.967,78.483 h1
  text "LED_Y" at 73.267,78.483 h1
  text "LED_R" at 82.767,78.483 h1
  text "OLED" at 36.417,72.75 h1
  text "ENC" at 58.417,72.75 h1
  text "Terminal IoT  rev. 2" at 36.409,37.302 h2.5
  text "M. Jazłowiecki" at 36.471,35.529 h1.5
  text "Politechnika Śląska, AEI  2026" at 36.452,32.517 h1.5
  text "FP" at 90.167,20.6 h1
  text "5V" at 7.167,15.5 h1
  text "GND" at 3.667,7 h1
  text "USB 5V" at 19.268,3.4 h1
  text "3V3" at 10.667,1 h1
Mechanical 1:
  the board outline again, w0.254

## Text inside footprints (layer, text, board x,y; h text height)
BZ1: Top Overlay "HW-508 Buzzer" at 85.876,50.23 h0.7; Top Overlay "S" at 92.167,59.58 h1; Top Overlay "-" at 92.167,54.58 h1; Top Assembly "HW-508 Buzzer" at 85.876,50.23 h0.7; Top Assembly "S" at 92.167,59.58 h1; Top Assembly "-" at 92.167,54.58 h1
J3: Top 3D Body "PCB EDGE" at 27.4,0.1 h0.41
M1: Top Overlay "CR2032" at 61.21,54.06 h2.5 r180; Top Overlay "DS3231" at 86.861,66.149 h2.2 r180; Top Assembly "CR2032" at 61.21,54.06 h2.5 r180
M2: Top Overlay "MicroSD Card module" at 72.495,16.45 h1.8 r180; Top Assembly "MicroSD Card module" at 72.495,16.45 h1.8 r180
U1: Top Overlay "USB IN" at 12.676,28.838 h1.1; Top Overlay "EN" at 3.962,29.624 h1.1; Top Overlay "BOOT" at 25.298,29.624 h1.1; Top Assembly "USB IN" at 12.676,28.838 h1.1; Top Assembly "EN" at 3.962,29.624 h1.1; Top Assembly "BOOT" at 25.298,29.624 h1.1